# Altium PCB cm4gateway.PcbDoc (part 5 of 5)
Units mil, origin at the board's own origin, x right, y up, seen from the top; angles counter-clockwise.
Board outline 6299.21 x 4960.63 mil, 8 copper layers (Signal 1, Ground Plane 1, Signal 2, Power Plane 1, Power Plane 2, Signal 3, Ground Plane 2, Signal 4), stack 60.024 mil thick; 403 components, 273 nets, 1526 pads, 1156 vias.
Unrouted connection lines stored in the file: 5.
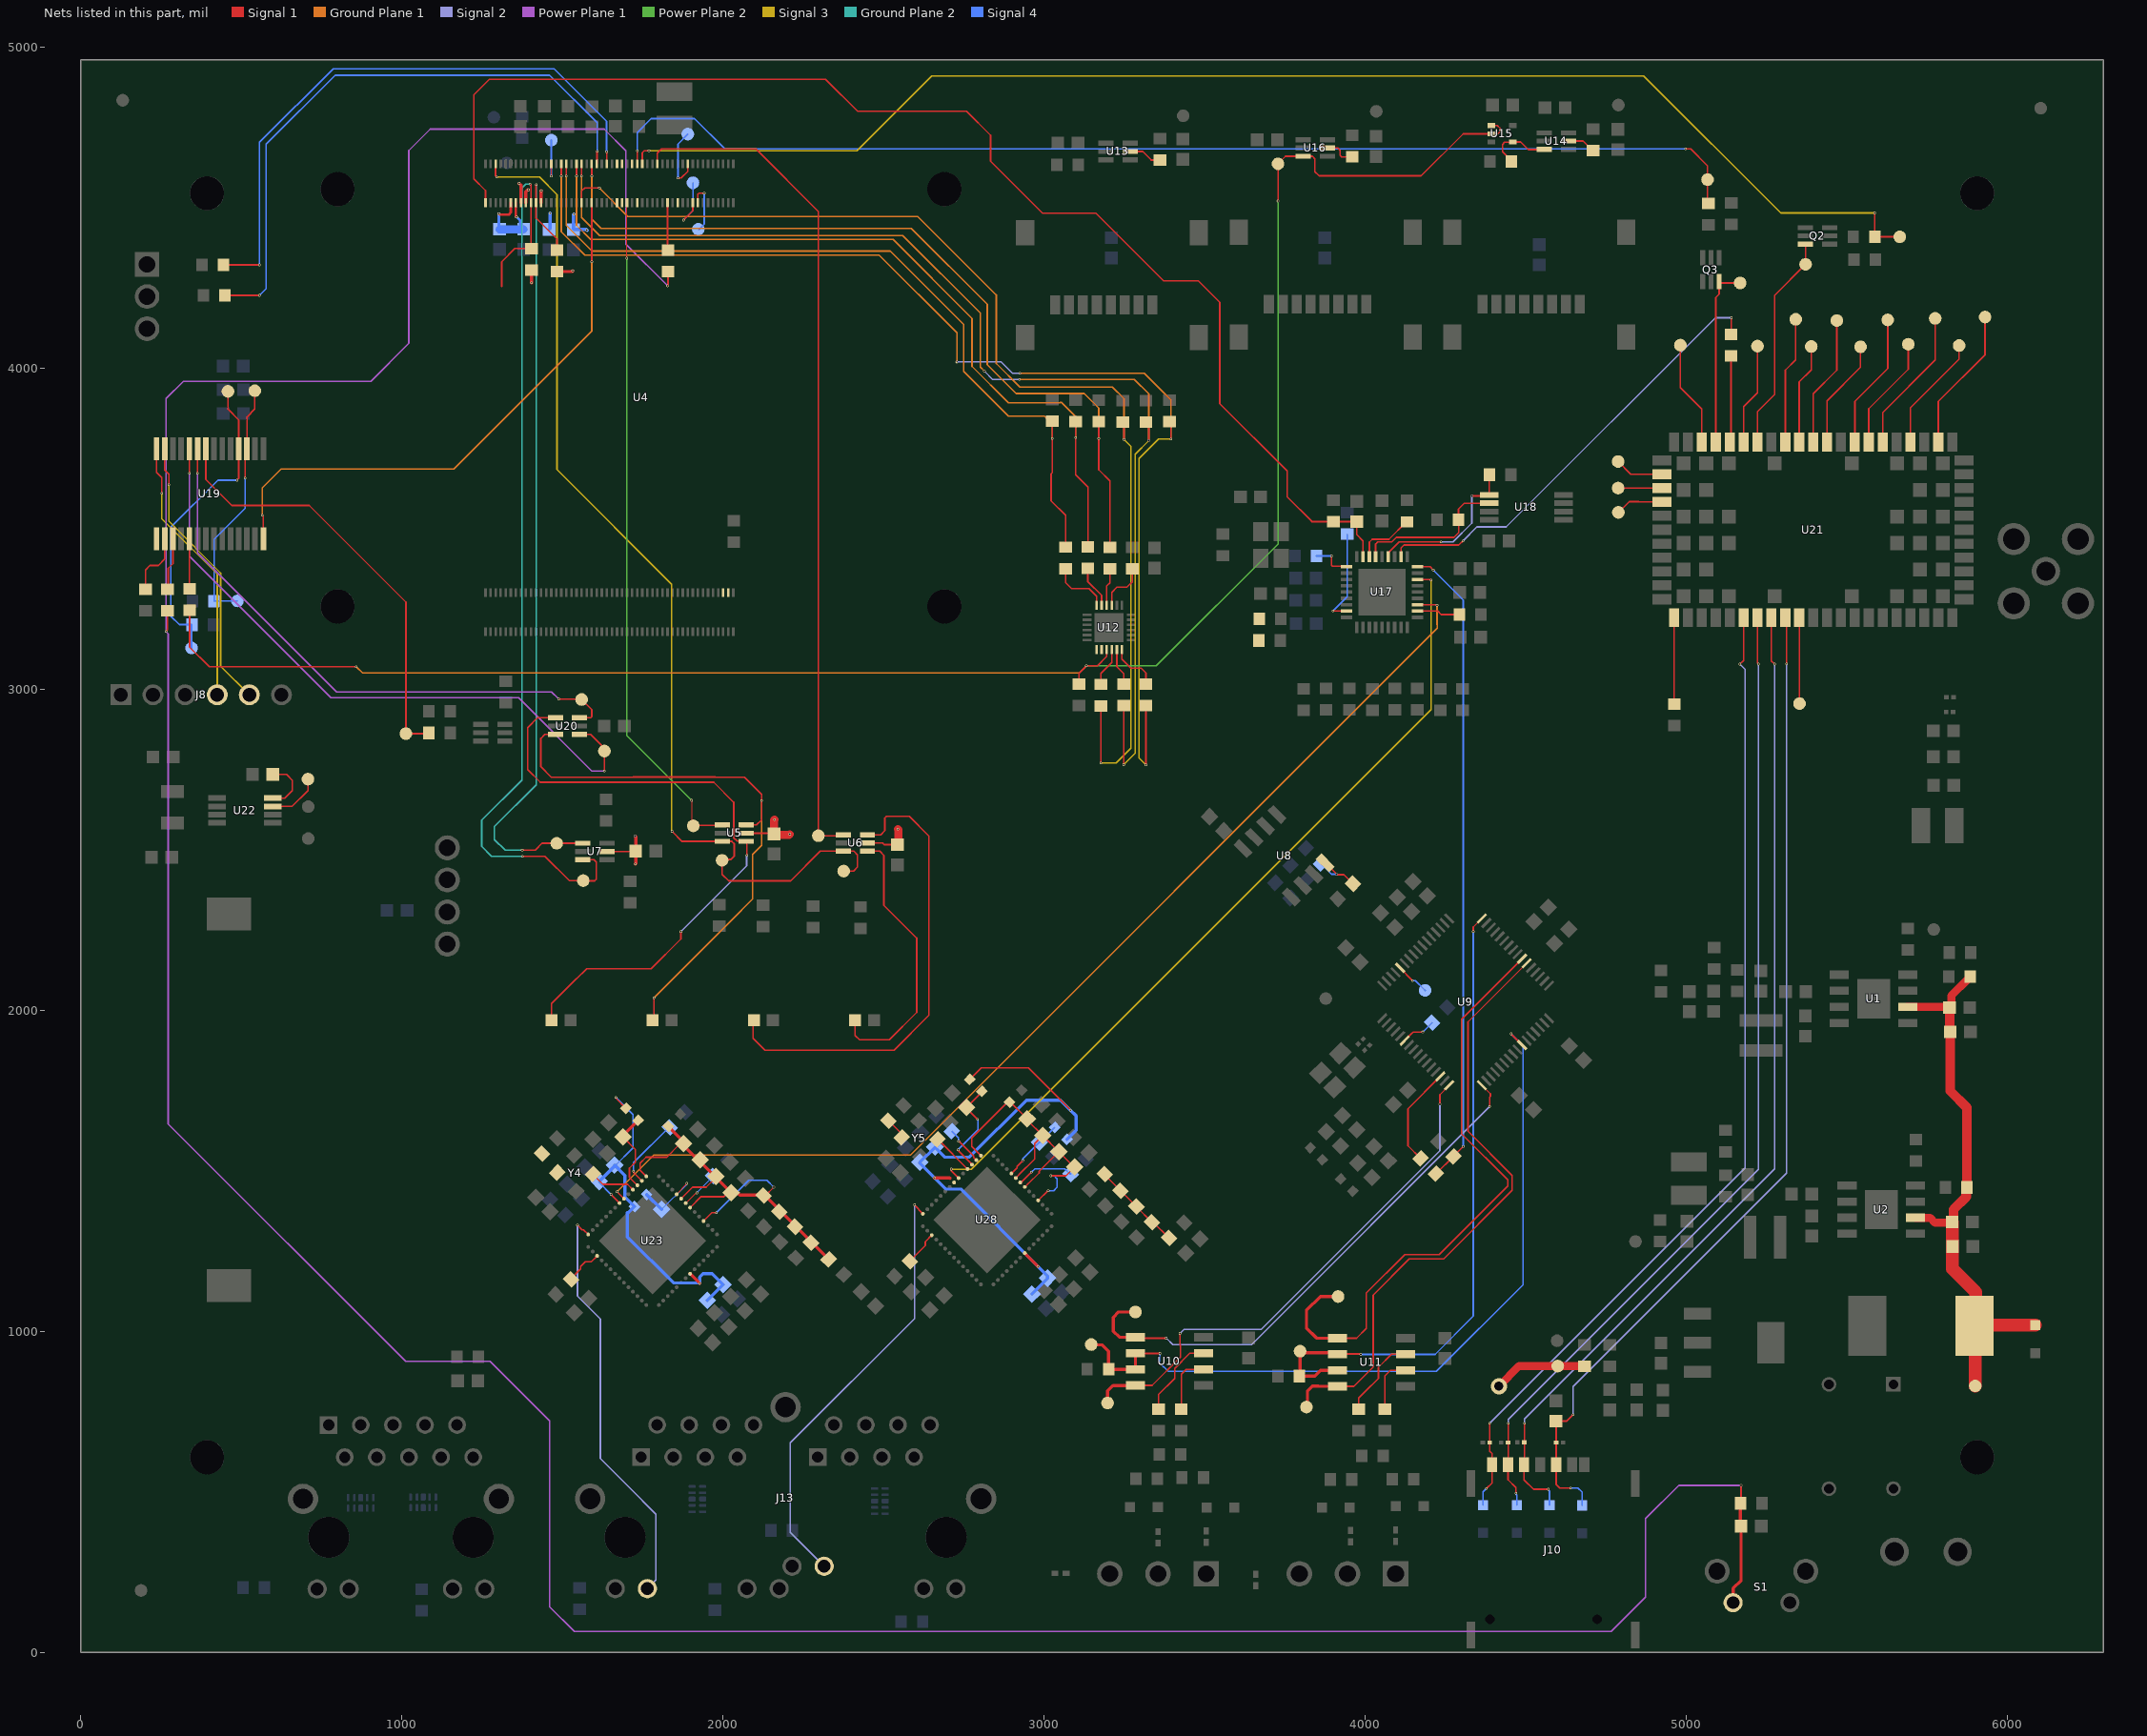
[diagram p10: the nets of this part, all layers, seen from the top]

## Via types
v1: diameter 8/8/8/8/8/8/8/8 (per signal layer), hole 5, Signal 1 to Signal 4, 822 vias
v2: diameter 8, hole 5, Signal 1 to Signal 4, tented both sides, 310 vias
v3: diameter 50, hole 28, Signal 1 to Signal 4, tented both sides, 10 vias
v4: diameter 8/8/8/8/8/8/8/8 (per signal layer), hole 5, Signal 1 to Signal 4, tented both sides, 9 vias
v5: diameter 8, hole 5, Signal 1 to Signal 4, 4 vias
v6: diameter 50, hole 5, Signal 1 to Signal 4, tented both sides, 1 vias

## Nets (pads, with @x,y where several pads share a name; then routed paths per layer and width w, separated by ;. In a path a pad name is that pad's centre, name@x,y a point inside that pad or via, vN(x,y) a via of type N, cw(c..) or ccw(c..) an arc to the next point about the centre after c; other vN are vias at no path point) (continued)
NetR28_2: R28.2 U4.28 | length 147.8
  Signal 1 w5: U4.28@1827.53,4514.4 1827.53,4368.34 R28.2@1828.74,4367.13
NetR34_1: R34.1 R35.2 U8.4 | length 175
  Signal 1 w5: U8.4@3875.61,2458.8 3912.4,2422.01 3933.65,2422.01 R35.2@3961.91,2393.75
  Signal 4 w5: R34.1@3862.5,2456.66 3895.93,2423.23 v2(3910.43,2423.23)
NetR37_1: R37.1 U10.6 | length 185.5
  Signal 1 w5: R37.1@3427.16,756.89 3427.16,866.14 3442.52,881.5 U10.6@3497.05,881.5
NetR39_1: R39.1 U10.7 | length 257.3
  Signal 1 w5: R39.1@3356.3,757.87 3356.3,803.15 3406.5,853.35 3406.5,884.25 3453.74,931.5 U10.7@3497.05,931.5
NetR42_2: R42.2 U9.6 | length 109.2
  Signal 1 w5: U9.6@4122.37,1905.22 4144.32,1927.17 4144.68,1927.17 4149.61,1932.09 v2(4179.13,1932.09)
  Signal 4 w5: v2(4179.13,1932.09) 4207.64,1960.59 R42.2@4207.64,1961.57
NetR43_1: R43.1 R44.2 U17.18 | length 2008.2
  Signal 1 w5: U17.18@4162.4,3380.91 4201.77,3380.91 v2(4211.61,3371.06) ; R43.1@4219.9,1490.73 4220.88,1490.73 R44.2@4275.01,1544.87 4275.01,1545.68 v2(4305.12,1575.79)
  Signal 4 w5: v2(4211.61,3371.06) 4305.12,3277.56 v2(4305.12,1575.79)
NetR43_2: R43.2 U9.14 | length 314
  Signal 1 w5: R43.2@4172.57,1538.06 4132.87,1577.76 4132.87,1693.01 U9.14@4233.73,1793.87
NetR46_1: R46.1 U11.6 | length 176.5
  Signal 1 w5: R46.1@4061.02,756.89 4061.02,861.22 4078.35,878.54 U11.6@4125.98,878.54
NetR48_1: R48.1 U11.7 | length 257.4
  Signal 1 w5: R48.1@3979.33,757.87 3979.33,791.83 4018.21,830.71 4018.7,830.71 4041.34,853.35 4041.34,887.8 4082.09,928.54 U11.7@4125.98,928.54
NetR51_2: R51.2 U12.18 | length 185.7
  Signal 1 w5: R51.2@3066.93,3375 3066.93,3331.69 3085.63,3312.99 3139.76,3312.99 3163.39,3289.37 U12.18@3163.39,3260.93
NetR53_2: R53.2 U12.17 | length 133
  Signal 1 w5: R53.2@3135.83,3375.98 3135.83,3335.63 3179.13,3292.32 U12.17@3179.13,3260.93
NetR54_2: R54.2 U12.16 | length 117.2
  Signal 1 w5: U12.16@3194.88,3260.93 3194.88,3320.87 3204.72,3330.71 R54.2@3204.72,3374.02
NetR55_2: R55.2 U12.4 | length 122
  Signal 1 w5: R55.2@3177.16,3014.76 3177.16,3049.21 3210.63,3082.68 U12.4@3210.63,3122.93
NetR56_2: R56.2 U12.5 | length 116.2
  Signal 1 w5: U12.5@3226.38,3122.93 3226.38,3069.88 3248.03,3048.23 R56.2@3248.03,3015.75
NetR57_2: R57.2 U12.6 | length 156.6
  Signal 1 w5: U12.6@3242.13,3122.93 3242.13,3093.5 3270.67,3064.96 3302.16,3064.96 3316.93,3050.2 R57.2@3316.93,3015.75
NetR58_2: R58.2 U12.15 | length 158
  Signal 1 w5: U12.15@3210.63,3260.93 3210.63,3301.18 3226.38,3316.93 3257.87,3316.93 3274.61,3333.66 R58.2@3274.61,3374.02
NetR59_2: R59.2 U13.5 | length 104.5
  Signal 1 w5: U13.5@3267.72,4674.21 3307.09,4674.21 3333.66,4647.64 R59.2@3361.22,4647.64
NetR67_2: R67.2 U14.5 | length 89
  Signal 1 w5: U14.5@4632.87,4706.69 4678.15,4706.69 4707.68,4677.17 R67.2@4709.65,4677.17
NetR68_2: R68.2 U14.3 U15.4 | length 209.3
  Signal 1 w5: R68.2@4455.71,4642.72 4455.71,4644.69 4427.16,4673.23 4427.16,4695.87 4434.05,4702.75 4458.66,4702.75 U15.4@4459.65,4703.74 4484.25,4703.74 4507.87,4680.12 4557.09,4680.12 U14.3@4558.07,4681.1
NetR69_2: R69.2 U16.5 | length 98.4
  Signal 1 w5: U16.5@3881.89,4685.04 3914.37,4685.04 3921.26,4678.15 3921.26,4662.4 3926.18,4657.48 R69.2@3959.64,4657.48
NetR79_1: R79.1 U17.11 | length 135.4
  Signal 1 w5: U17.11@4162.4,3243.11 4225.39,3243.11 4236.22,3232.28 R79.1@4293.31,3232.28
NetR81_1: R81.1 U17.35 | length 299.8
  Signal 1 w5: v2(3899.61,3243.11) U17.35@3941.93,3243.11
  Signal 4 w5: v2(3899.61,3243.11) 3943.9,3287.4 R81.1@3943.9,3482.28
NetR88_1: R88.1 U17.28 | length 124.1
  Signal 1 w5: v2(3894.68,3414.37) 3894.68,3385.83 3897.64,3382.87 3939.96,3382.87 U17.28@3941.93,3380.91
  Signal 4 w5: R88.1@3848.42,3414.37 v2(3894.68,3414.37)
NetR91_2: R91.2 U19.2 | length 197.9
  Signal 1 w5: R91.2@201.77,3311.02 201.77,3371.06 215.55,3384.84 242.13,3384.84 261.81,3404.53 U19.2@261.81,3468.5
NetR92_2: R92.2 U19.3 | length 164.4
  Signal 1 w5: R92.2@270.67,3311.02 272.64,3312.99 272.64,3375.98 287.4,3390.75 U19.3@287.4,3468.5
NetR93_2: R93.2 U19.5 | length 156.9
  Signal 1 w5: U19.5@338.58,3468.5 338.58,3312.99 R93.2@339.57,3312.01
NetR101_1: R101.1 U21.17 | length 269.3
  Signal 1 w5: U21.17@5134.84,3769.69 5138.78,3773.62 R101.1@5138.78,4037.4
NetR101_2: R101.2 U17.20 | length 1405.5
  Signal 1 w5: U17.20@4111.22,3412.4 4111.22,3439.96 4120.08,3448.82 4291.34,3448.82 v2(4304.13,3461.61) ; R101.2@5138.78,4104.33 5139.76,4105.32 v2(5139.76,4156.5)
  Signal 2 w5: v2(4304.13,3461.61) 4347.44,3504.92 4438.98,3504.92 5090.55,4156.5 v2(5139.76,4156.5)
NetR102_1: R102.1 U21.33 | length 269.1
  Signal 1 w5: U21.33@4961.61,3222.44 4961.61,2954.72 R102.1@4962.6,2953.74
NetR103_2: R103.2 TP58.1 U4.37 | length 4300.2
  Signal 1 w5: U4.37@1748.79,4635.66 1748.79,4670.05 1754.92,4676.18 v5(1769.68,4676.18) ; v5(5586.61,4482.89) R103.2@5586.61,4408.47 TP58.1@5664.37,4408.47
  Signal 3 w5: v5(1769.68,4676.18) 2417.32,4676.18 2650.59,4909.45 4867.13,4909.45 5293.68,4482.89 v5(5586.61,4482.89)
NetR105_2: R105.2 TP60.1 U4.39 | length 3627.4
  Signal 1 w5: U4.39@1733.04,4635.66 1733.16,4635.78 1733.16,4676.07 v5(1733.27,4676.18) ; v5(4997.05,4682.09) 5013.78,4682.09 5065.94,4629.92 TP60.1@5065.94,4586.61 5065.94,4515.75 R105.2@5068.9,4512.8
  Signal 4 w5: v5(1733.27,4676.18) 1733.27,4733.27 1776.57,4776.57 1911.42,4776.57 2005.91,4682.09 v5(4997.05,4682.09)
NetR117_1: R117.1 U23.31 | length 117
  Signal 1 w5: R117.1@1526.98,1162.08 1526.98,1163.79 1557.09,1193.9 1557.09,1201.77 1571.85,1216.54 1590.03,1216.54 U23.31@1608.28,1234.79
NetR118_1: R118.1 Y4.1
NetR119_2: R119.2 U23.16 | length 228.4
  Signal 1 w5: v2@1723.72,1495.77 v2(1721.46,1498.03) 1722.03,1497.46 1722.03,1494.08 U23.16@1747.47,1468.63
  Signal 4 w5: v2(1721.46,1498.03) 1721.46,1524.61 1832.27,1635.42 R119.2@1833.99,1635.42
NetR120_2: R120.2 U23.8 | length 121.4
  Signal 1 w3: U23.8@1883.88,1399.04 1885.06,1399.04 1917.13,1431.1 v2(1918.31,1431.1)
  Signal 4 w3: v2(1918.31,1431.1) 1968.83,1481.63 R120.2@1968.83,1483.84
NetR128_1: R128.1 U28.31 | length 109
  Signal 1 w5: R128.1@2581.73,1218.55 2629.92,1266.73 2629.92,1278.82 U28.31@2650.23,1299.13
NetR129_1: R129.1 Y5.1 | length 69.2
  Signal 1 w5: R129.1@2515.71,1655.47 2556.53,1614.65 Y5.1@2556.53,1603.18
NetR132_2: R132.2 U28.16 | length 121.8
  Signal 1 w4: v2(2734.18,1591.96) 2780.35,1545.79 2780.35,1542.06 U28.16@2789.43,1532.98
  Signal 4 w4: R132.2@2712.64,1622.99 2733.67,1601.96 2733.67,1592.47 v2(2734.18,1591.96)
NetR133_2: R133.2 U28.8 | length 181
  Signal 1 w4: U28.8@2925.84,1463.38 2927.85,1463.38 2959.55,1495.08 v2(2960.63,1495.08)
  Signal 4 w5: v2(2960.63,1495.08) 2971.46,1505.91 3064.12,1505.91 3079.91,1490.12 R133.2@3082.64,1490.12
NetTP1_1: TP1.1 U4.16 | length 169.7
  Signal 1 w5: U4.16@1922.02,4514.4 1922.02,4541.11 1925.2,4544.29 v2(1941.93,4544.29)
  Signal 4 w5: TP1.1@1923.23,4432.09 1926.33,4432.09 1941.93,4447.69 v2(1941.93,4544.29)
NetTP2_1: TP2.1 U4.18 | length 194.3
  Signal 1 w5: v2(1876.97,4460.63) 1906.27,4489.93 U4.18@1906.27,4514.4
  Signal 4 w5: v2(1876.97,4460.63) 1906.5,4490.16 TP2.1@1906.5,4576.77
NetTP3_1: TP3.1 U4.19 | length 210.7
  Signal 1 w5: v2@1861.22,4591.54 1870.08,4591.54 1890.52,4611.98 U4.19@1890.52,4635.66
  Signal 4 w5: v2(1859.98,4591.86) 1859.98,4697.58 TP3.1@1890.75,4728.35
NetTP12_1: TP12.1 U4.73 | length 150.5
  Signal 1 w2: U4.73@1465.33,4635.66 1465.55,4635.44 v2(1465.55,4597.44)
  Signal 4 w5: v2(1465.55,4597.44) TP12.1@1465.55,4709.65
NetTP22_1: TP22.1 U9.60 | length 107.9
  Signal 1 w5: U9.60@4108.45,2132.11 4108.45,2131.41 4147.64,2092.23 v2(4147.64,2091.54)
  Signal 4 w5: v2(4147.64,2091.54) 4156.5,2091.54 TP22.1@4186.39,2061.64
NetTP43_1: TP43.1 U21.13 | length 395.3
  Signal 1 w5: U21.13@5308.07,3769.69 5308.07,3993.11 5340.55,4025.59 TP43.1@5340.55,4151.58
NetTP44_1: TP44.1 U21.12 | length 312.7
  Signal 1 w5: U21.12@5351.38,3769.69 5351.38,3956.69 5388.78,3994.09 TP44.1@5388.78,4066.93
NetTP45_1: TP45.1 U21.11 | length 408.5
  Signal 1 w5: U21.11@5394.68,3769.69 5394.68,3919.29 5468.5,3993.11 TP45.1@5468.5,4147.64
NetTP46_1: TP46.1 U21.10 | length 339.5
  Signal 1 w5: U21.10@5437.99,3769.69 5437.99,3897.64 5542.32,4001.97 TP46.1@5542.32,4065.95
NetTP47_1: TP47.1 U21.4 | length 363
  Signal 1 w5: U21.4@5697.83,3769.69 5697.83,3875.98 5849.41,4027.56 TP47.1@5849.41,4069.88
NetTP48_1: TP48.1 U21.42 | length 268.1
  Signal 1 w5: U21.42@5351.38,3222.44 5352.36,3221.46 TP48.1@5352.36,2954.73
NetTP49_1: TP49.1 U21.2 | length 449.1
  Signal 1 w5: U21.2@5784.45,3769.69 5784.45,3895.67 5930.12,4041.34 TP49.1@5930.12,4158.47
NetTP50_1: TP50.1 U21.25 | length 150.1
  Signal 1 w5: TP50.1@4788.39,3550.2 4821.85,3583.66 4851.38,3583.66 4852.36,3582.68 U21.25@4924.21,3582.68
NetTP51_1: TP51.1 U21.24 | length 136.8
  Signal 1 w5: TP51.1@4787.4,3625.98 U21.24@4924.21,3625.98
NetTP52_1: TP52.1 U21.23 | length 153.1
  Signal 1 w5: TP52.1@4787.4,3708.66 4826.77,3669.29 U21.23@4924.21,3669.29
NetTP53_1: TP53.1 U21.19 | length 328.9
  Signal 1 w5: TP53.1@4981.3,4070.87 4981.3,3938.98 5048.23,3872.05 U21.19@5048.23,3769.69
NetTP54_1: TP54.1 U21.16 | length 316.2
  Signal 1 w5: U21.16@5178.15,3769.69 5178.15,3879.92 5221.46,3923.23 TP54.1@5221.46,4067.91
NetTP55_1: TP55.1 U21.8 | length 422.3
  Signal 1 w5: U21.8@5524.61,3769.69 5524.61,3895.67 5626.97,3998.03 TP55.1@5626.97,4149.61
NetTP56_1: TP56.1 U21.7 | length 355.1
  Signal 1 w5: U21.7@5567.91,3769.69 5567.91,3873.03 5690.94,3996.06 TP56.1@5690.94,4073.82
NetTP57_1: TP57.1 U21.6 | length 452.5
  Signal 1 w5: U21.6@5611.22,3769.69 5611.22,3861.22 5774.61,4024.61 TP57.1@5774.61,4154.53
NetTP62_1: TP62.1 U22.7 | length 165.1
  Signal 1 w5: U22.7@598.42,2634.84 658.47,2634.84 707.68,2684.05 TP62.1@707.68,2719.49
NetU4_58: U4.58 U19.14 | length 1787.2
  Signal 1 w5: v2(565.94,3541.34) 565.94,3540.53 568.9,3537.57 U19.14@568.9,3468.5 ; v2(1591.31,4330.71) U4.58@1591.31,4514.4
  Ground Plane 1 w5: v2(565.94,3541.34) 565.94,3626.97 624.02,3685.04 1162.4,3685.04 1591.31,4113.95 v2(1591.31,4330.71)
NetU17_12: U17.12 U23.20 | length 3445.4
  Signal 1 w5: v2(1670.28,1435.04) 1670.28,1434.47 U23.20@1691.79,1412.96 ; U17.12@4162.4,3262.8 4220.64,3262.8 4222.61,3260.83 v2(4223.43,3260.83)
  Ground Plane 1 w5: v2(1670.28,1435.04) 1784.45,1549.21 2584.05,1549.21 4224.41,3189.57 4224.41,3199.8 4223.43,3200.79 v2(4223.43,3260.83)
NetU17_16: U17.16 U28.20 | length 2570.8
  Signal 1 w4: v2(2710.63,1504.92) 2711.39,1504.16 2711.39,1499.66 U28.20@2733.75,1477.3 ; U17.16@4162.4,3341.54 4201.67,3341.54 4203.64,3339.57 v2(4204.72,3339.57)
  Signal 3 w4: v2(2710.63,1504.92) 2773.62,1504.92 4204.72,2936.02 v2(4204.72,3339.57)
NetU23_18: U23.18 Y4.3 | length 144.2
  Signal 1 w5: Y4.3@1595.41,1488.98 1626.71,1457.68 1702.75,1457.68 U23.18@1719.63,1440.8
NetU28_18: U28.18 Y5.3 | length 132
  Signal 1 w5: Y5.3@2667.88,1597.61 2669.12,1597.61 U28.18@2761.59,1505.14
PGC: J8.5 U19.27 | length 874.8
  Signal 1 w5: U19.27@261.81,3748.03 261.81,3682.09 274.61,3669.29 v2(274.61,3636.81)
  Signal 3 w5: v2(274.61,3636.81) 274.61,3522.64 436.02,3361.22 436.02,3071.46 J8.5@525.2,2982.28
PGD: J8.4 U19.28 | length 844
  Signal 1 w5: U19.28@236.22,3748.03 236.22,3675.2 252.95,3658.47 v2(252.95,3609.25)
  Signal 3 w5: v2(252.95,3609.25) 252.95,3530.51 425.2,3358.27 J8.4@425.2,2982.28
PWR_LED: TP7.1 TP10.1 U4.95 U5.3 U6.3 | length 3280.8
  Signal 1 w5: U4.95@1292.1,4635.66 1292.1,4598.48 1295.27,4595.3 v2(1295.27,4594.49) ; v2(1841.53,2557.09) 1873.03,2525.59 U5.3@1998.03,2525.59 ; U5.3@1997.14,2524.7 U5.3@1998.03,2525.59 ; TP10.1@2375.98,2433.07 2406.5,2433.07 2419.19,2445.76 2419.19,2483.37 2407.48,2495.08 U6.3@2375,2495.08 2303.15,2495.08 2210.63,2402.56 2017.72,2402.56 1997.14,2423.14 TP7.1@1997.14,2466.76 1999.58,2469.21 2024.32,2469.21 2035.43,2480.32 2035.43,2517.72 2027.56,2525.59 U5.3@1998.03,2525.59
  Signal 3 w5: v2(1295.27,4594.49) 1429.13,4594.49 1483.27,4540.36 1483.27,3683.56 1840.55,3326.28 1840.55,2558.07 v2(1841.53,2557.09)
PWR_ON: Q2.6 TP59.1 U21.15 | length 678.1
  Signal 1 w5: U21.15@5221.46,3769.69 5221.46,3864.17 5274.61,3917.32 5274.61,4226.38 TP59.1@5371.06,4322.84 Q2.6@5371.06,4385.83
RESET: Q3.6 TP61.1 U21.18 | length 570.2
  Signal 1 w5: U21.18@5091.53,3769.69 5091.53,4219.49 5102.09,4230.05 Q3.6@5102.09,4268.7 5106.03,4264.76 TP61.1@5167.32,4264.76
RESET_IN: C68.2 R83.2 U4.100 U17.26 | length 4088.1
  Signal 1 w5: U4.100@1260.6,4514.4 1260.6,4552.39 1224.41,4588.58 1224.41,4850.89 1272.64,4899.11 2319.39,4899.11 2419.29,4799.21 2758.86,4799.21 2833.42,4724.66 2833.42,4643.95 2995.08,4482.28 3161.42,4482.28 3372.05,4271.65 3480.32,4271.65 3547.24,4204.72 3547.24,3888.78 3756.89,3679.13 3756.89,3598.43 3833.66,3521.65 R83.2@3900.59,3521.65 C68.2@3973.42,3521.65 3973.42,3481.3 3993.11,3461.61 U17.26@3993.11,3412.4
RPi_1V8_OUT: C24.2 C25.2 U4.88 U4.90 | length 287.8
  Signal 1 w8: v2(1302.16,4480.32) 1305.12,4477.36 1332.68,4477.36 1339.34,4484.03 U4.90@1339.34,4514.4 ; U4.88@1355.09,4514.4 1355.09,4472.67 v2(1357.28,4470.47)
  Signal 4 w8: v2(1302.16,4480.32) 1302.16,4434.28 C24.2@1304.35,4432.09 ; v2(1357.28,4470.47) 1368.67,4459.09 1368.67,4442.58 C25.2@1379.16,4432.09
  Signal 4 w25: C24.2@1304.35,4432.09 C25.2@1379.16,4432.09
RPi_3V3_OUT: C19.2 C20.2 C21.2 C22.2 C23.2 R18.2 R29.1 R30.1 TP69.1 U4.78 U4.84 U4.86 U5.5 U6.5 U7.5 | length 1180.8
  Signal 1 w5: U7.5@1638.78,2494.1 1727.36,2494.1 C21.2@1728.35,2495.08 ; U5.5@2072.83,2551.18 2157.48,2551.18 C19.2@2159.45,2549.21 ; U6.5@2449.8,2520.67 2497.05,2520.67 2502.15,2515.56 C20.2@2543.65,2515.56
  Signal 1 w10: v2(1365.37,4574.59) 1370.84,4569.12 U4.86@1370.84,4514.4 ; U4.84@1386.59,4514.4 1386.59,4549.05 1392.44,4554.91 v2(1394.31,4554.91) ; R29.1@1403.54,4305.12 1403.54,4272.82 1403.76,4272.61 v2@1403.76,4265.54 ; U4.78@1433.83,4514.4 1433.83,4551.52 v2(1434.27,4551.95) ; R30.1@1483.27,4300.2 1529.96,4300.2 v2(1532.37,4302.61) ; v2(1726.59,2542.11) 1728.35,2540.35 C21.2@1728.35,2495.08 1728.35,2456.27 v2(1727.57,2455.5)
  Signal 1 w25: v2(2160.64,2593.29) 2159.45,2592.1 C19.2@2159.45,2549.21 2162.72,2545.95 2205.82,2545.95 v2(2207.89,2548.02) ; v2(2544.5,2563.76) 2546.57,2561.69 2546.57,2518.48 C20.2@2543.65,2515.56 C20.2@2545.65,2513.57 ; v3(4416.34,828.74) 4479.33,891.73 TP69.1@4599.41,891.73 4599.9,891.24 4682.58,891.24 R18.2@4683.07,890.75
  Signal 4 w10: C22.2@1459.14,4431.27 1461.61,4433.74 v2(1461.61,4482.07) ; v2(1535.64,4479.12) 1534.67,4478.14 C23.2@1534.67,4431.1 1574.8,4431.1 v2@1576.98,4428.92
  other v2: 1403.54,4265.75 1575.79,4429.13
RPi_GPIO9: U4.40
RPi_GPIO10: TP6.1 U4.44 U5.1 | length 2117.9
  Signal 1 w2: v2(1700.79,4342.03) 1700.79,4513.64 U4.44@1701.55,4514.4 ; v2(1902.56,2653.54) 1903.71,2652.4 1903.71,2577.91 TP6.1@1907.57,2574.05
  Signal 1 w5: TP6.1@1907.57,2574.05 1909.31,2575.79 1997.05,2575.79 U5.1@1998.03,2576.77
  Power Plane 2 w5: v2(1700.79,4342.03) 1700.79,2855.32 v2(1902.56,2653.54)
RPi_GPIO12: TP9.1 U4.31 U6.1 | length 2643.6
  Signal 1 w5: U4.31@1796.03,4635.66 1796.03,4669.07 1809.06,4682.09 2102.36,4682.09 2297.24,4487.2 TP9.1@2297.24,2543.31 2372.05,2543.31 U6.1@2375,2546.26
RPI_RST: R94.2 TP41.1 U19.22 | length 1357.8
  Signal 1 w5: U19.22@389.76,3748.03 389.76,3652.56 470.47,3571.85 711.61,3571.85 1012.79,3270.67 TP41.1@1012.79,2861.22 1081.69,2861.22 R94.2@1083.66,2863.19
RPi_RXD0: R19.2 U4.51 | length 1870.8
  Signal 1 w5: R19.2@444.88,4320.87 v2(557.09,4320.87) ; v2(1637.79,4673.11) 1638.17,4672.73 1638.17,4636.04 U4.51@1638.55,4635.66
  Signal 4 w5: v2(557.09,4320.87) 557.09,4702.76 786.42,4932.09 1474.41,4932.09 1637.79,4768.7 v2(1637.79,4673.11)
RPi_RXD3: R24.1 TP11.1 TP38.1 U19.17 | length 781.3
  Signal 1 w5: v2(511.81,3657.48) 511.81,3742.13 U19.17@517.72,3748.03 517.72,3847.44 542.32,3872.05 TP38.1@542.32,3929.13
  Signal 4 w5: TP11.1@488.19,3274.61 416.34,3274.61 R24.1@415.35,3273.62 415.35,3466.54 511.81,3562.99 v2(511.81,3657.48)
RPi_TXD0: R20.2 U4.55 | length 1896.5
  Signal 1 w5: R20.2@448.82,4226.38 v2(557.09,4226.38) ; U4.55@1607.06,4635.66 1607.69,4636.3 1607.69,4674.21 v2(1608.27,4674.79)
  Signal 4 w5: v2(557.09,4226.38) 577.76,4247.05 577.76,4696.85 792.32,4911.42 1460.63,4911.42 1608.27,4763.78 v2(1608.27,4674.79)
RPi_TXD3: R23.1 TP8.1 TP37.1 U19.18 | length 986.1
  Signal 1 w5: TP37.1@458.66,3927.17 458.66,3872.05 492.13,3838.58 U19.18@492.13,3748.03 492.13,3656.33 487.2,3651.4 v2(487.2,3650.59)
  Signal 4 w5: TP8.1@345.47,3127.95 345.47,3198.82 R23.1@346.46,3199.8 345.47,3200.79 307.09,3200.79 280.51,3227.36 280.51,3503.94 427.17,3650.59 v2(487.2,3650.59)
RPi_USB_N: U4.103
RPi_USB_P: U4.105
RS485A_EN: R40.2 TP20.1 U9.26 U10.2 U10.3 | length 2457.7
  Signal 1 w5: U10.2@3284.45,931.5 3284.84,931.1 v2(3361.22,931.1) ; v2(4454.72,1926.18) 4454.72,1925.61 4488.45,1891.88 U9.26@4488.45,1891.3
  Signal 1 w10: TP20.1@3146.65,958.66 3147.87,957.44 3181.34,957.44 3200.79,937.99 R40.2@3200.79,881.89 3201.18,881.5 U10.3@3284.45,881.5 U10.2@3284.45,931.5
  Signal 4 w5: v2(3361.22,931.1) 3361.22,900.59 3386.81,875 4221.46,875 4491.14,1144.69 4491.14,1889.76 v2(4454.72,1926.18)
RS485A_RX: TP17.1 U9.17 U10.1 | length 1693.5
  Signal 1 w5: U10.1@3284.45,981.5 3287.6,978.35 v2(3379.92,978.35) ; U9.17@4363.18,1766.03 4389.76,1739.45 4389.76,1731.3 4387.79,1729.33 v2(4387.79,1699.8)
  Signal 1 w10: U10.1@3284.45,981.5 3234.06,981.5 3215.55,1000 3215.55,1043.31 3232.28,1060.04 TP17.1@3284.45,1060.04
  Signal 2 w5: v2(3379.92,978.35) 3380.73,978.35 3400.42,958.66 3646.65,958.66 v2(4387.79,1699.8)
RS485A_TX: TP19.1 U9.16 U10.4 | length 1641.5
  Signal 1 w5: U10.4@3284.45,831.5 3336.42,831.5 3424.42,919.5 3424.42,955.3 3423.23,956.49 v2(3423.23,993.11) ; v2(4232.28,1706.69) 4232.28,1736.74 U9.16@4261.57,1766.03
  Signal 1 w10: TP19.1@3197.83,776.58 3197.83,813.98 3214.57,830.71 U10.4@3283.66,830.71
  Signal 2 w5: v2(3423.23,993.11) 3436.02,1005.91 3676.18,1005.91 4232.28,1562.01 v2(4232.28,1706.69)
RS485B_EN: R49.2 TP24.1 U9.48 U11.2 U11.3 | length 2046.5
  Signal 1 w5: U11.2@3913.39,928.54 3913.98,929.13 3984.42,929.13 3985.41,928.15 v2(3986.22,928.15) ; v2(4336.61,2245.08) 4336.61,2258.66 U9.48@4363.18,2285.22
  Signal 1 w10: U11.3@3913.39,878.54 3860.83,878.54 3842.52,860.24 R49.2@3795.27,860.24 3797.24,862.21 TP24.1@3797.24,937.99 3801.97,933.27 3908.66,933.27 U11.2@3913.39,928.54
  Signal 4 w5: v2(3986.22,928.15) 4217.52,928.15 4336.61,1047.25 v2(4336.61,2245.08)
RS485B_RX: TP21.1 U9.39 U11.1 | length 1917
  Signal 1 w5: U11.1@3913.39,978.54 3972.64,978.54 4002.95,1008.86 4002.95,1119.1 4123.03,1239.17 4230.31,1239.17 4443.76,1452.62 4443.76,1471.32 4300.2,1614.88 4300.2,1971.69 U9.39@4488.45,2159.95
  Signal 1 w10: U11.1@3913.39,978.54 3848.23,978.54 3816.93,1009.84 3816.93,1064.96 3860.24,1108.27 TP21.1@3915.35,1108.27
RS485B_TX: TP23.1 U9.38 U11.4 | length 1919.1
  Signal 1 w5: U11.4@3913.39,828.54 3964.81,828.54 4024.61,888.34 4024.61,1112.91 4136.95,1225.25 4244.23,1225.25 4457.68,1438.7 4457.68,1485.24 4319.88,1623.03 4319.88,1963.54 U9.38@4502.37,2146.03
  Signal 1 w10: TP23.1@3816.93,763.78 3819.88,766.73 3819.88,812.99 3835.63,828.74 3853.35,828.74 3853.54,828.54 U11.4@3913.39,828.54
RST: U19.1
SCL0: R30.2 TP14.1 U4.80 U7.1 | length 2622.4
  Signal 1 w5: v4(1375,2498.03) 1415.35,2498.03 1437.01,2519.69 TP14.1@1482.28,2519.69 U7.1@1563.98,2519.69 ; v2(1418.31,4570.87) 1418.19,4570.75 1418.19,4514.52 U4.80@1418.08,4514.4 1418.08,4466.76 1483.27,4401.57 R30.2@1483.27,4367.13
  Ground Plane 2 w5: v4(1375,2498.03) 1321.85,2498.03 1288.39,2531.5 1288.39,2571.98 1418.31,2701.9 v2(1418.31,4570.87)
SD0_CLK: U4.46
SD0_CMD: U4.47
SD0_DAT0: U4.45
SD0_DAT1: U4.41
SD0_DAT2: U4.24
SD0_DAT3: U4.48
SD_CLK: R54.1 R66.1 U4.57 | length 2605.9
  Signal 1 w5: v2(1591.31,4597.44) U4.57@1591.31,4635.66 ; R66.1@3170.27,3832.68 3170.27,3683.07 3204.72,3648.62 R54.1@3204.72,3440.95
  Ground Plane 1 w5: v2(1591.31,4597.44) 1591.31,4463.81 1620.08,4435.04 2586.61,4435.04 2822.83,4198.82 2822.83,4009.84 2912.4,3920.28 3125,3920.28 3170.28,3875 v2(3170.28,3780.51)
SD_CMD: R55.1 R65.1 U4.62 | length 3571.1
  Signal 1 w5: U4.62@1559.81,4514.4 1559.81,4550.96 1569.88,4561.02 v2(1615.16,4561.02) ; v2(3177.16,2769.69) R55.1@3177.16,2947.84 ; R65.1@3245.08,3831.69 3249.02,3827.76 v2(3249.02,3777.56)
  Ground Plane 1 w5: v2(1615.16,4561.02) 1704.03,4472.15 2606.59,4472.15 2851.38,4227.36 2851.38,4013.78 2924.21,3940.94 3212.6,3940.94 3249.02,3904.53 v2(3249.02,3777.56)
  Signal 3 w5: v2(3177.16,2769.69) 3224.41,2769.69 3270.67,2815.94 3270.67,3755.91 v2(3249.02,3777.56)
SD_DAT0: R53.1 R61.1 U4.63 | length 2552
  Signal 1 w5: v2(1544.07,4597.44) U4.63@1544.07,4635.66 ; R61.1@3098.42,3832.68 3098.42,3667.32 3136.81,3628.94 3136.81,3443.9 R53.1@3135.83,3442.91
  Ground Plane 1 w5: v2(1544.07,4597.44) 1544.07,4444.24 1587.94,4400.37 2529.87,4400.37 2775.59,4154.64 2775.59,4004.92 2888.78,3891.73 3049.21,3891.73 3050.09,3892.61 3054.24,3892.61 3098.43,3848.43 v2(3098.43,3783.46)
SD_DAT1: R51.1 R62.1 U4.67 | length 2504.8
  Signal 1 w5: v2(1512.57,4597.44) U4.67@1512.57,4635.66 ; R62.1@3025.59,3834.65 3025.59,3674.21 3021.76,3670.38 3021.76,3586.35 3066.93,3541.18 R51.1@3066.93,3441.93
  Ground Plane 1 w5: v2(1512.57,4597.44) 1512.57,4444.12 1592.46,4364.24 2521.46,4364.24 2750,4135.69 2750,3989.17 2888.78,3850.39 3000.98,3850.39 3025.59,3825.79 v2(3025.59,3780.51)
SD_DAT2: R57.1 R63.1 U4.69 | length 3829.2
  Signal 1 w5: v2(1496.82,4597.44) U4.69@1496.82,4635.66 ; v2(3316.93,2763.78) R57.1@3316.93,2948.82 ; R63.1@3390.75,3832.68 3394.68,3828.74 v2(3394.68,3778.54)
  Ground Plane 1 w5: v2(1496.82,4597.44) 1496.82,4424.67 1570.11,4351.38 2486.22,4351.38 2728.35,4109.25 v2(2728.35,4018.7) ; v2(2924.21,3983.27) 3312.01,3983.27 3394.68,3900.59 v2(3394.68,3778.54)
  Signal 2 w5: v2(2728.35,4018.7) 2866.14,4018.7 2901.57,3983.27 v2(2924.21,3983.27)
  Signal 3 w5: v2(3316.93,2763.78) 3295.28,2785.43 3295.28,3717.52 3356.3,3778.54 v2(3394.68,3778.54)
SD_DAT3: R56.1 R64.1 U4.61 | length 3691.6
  Signal 1 w5: v2(1559.81,4597.44) U4.61@1559.81,4635.66 ; v2(3248.03,2764.76) R56.1@3248.03,2948.82 ; R64.1@3316.93,3831.69 3325.79,3822.84 v2(3325.79,3773.62)
  Ground Plane 1 w5: v2(1559.81,4597.44) 1559.81,4468.73 1615.77,4412.77 2559.67,4412.77 2801.18,4171.26 2801.18,4002.95 v2(2813.98,3990.16) ; v2(2923.23,3964.57) 3280.51,3964.57 3325.79,3919.29 v2(3325.79,3773.62)
  Signal 2 w5: v2(2813.98,3990.16) 2839.57,3964.57 v2(2923.23,3964.57)
  Signal 3 w5: v2(3248.03,2764.76) 3283.46,2800.2 3283.46,3731.3 v2(3325.79,3773.62)
SDA0: R29.2 TP15.1 U4.82 U7.3 | length 3023.8
  Signal 1 w5: 1311.02,4253.94 1311.02,4330.71 1352.36,4372.05 R29.2@1403.54,4372.05 1402.33,4373.26 U4.82@1402.33,4514.4 1402.33,4550.91 1402.81,4551.38 1402.81,4558.43 1402.33,4558.9 1402.33,4570.11 v2(1399.61,4572.83) ; v4(1375.98,2479.33) 1445.87,2479.33 1521.65,2403.54 TP15.1@1564.96,2403.54 1565.94,2402.56 1600.39,2402.56 1605.32,2407.48 1605.32,2461.61 1598.42,2468.5 U7.3@1563.98,2468.5
  Ground Plane 2 w5: v4(1375.98,2479.33) 1279.53,2479.33 1249.02,2509.84 1249.02,2591.54 1374.02,2716.54 1374.02,4561.02 1385.83,4572.83 v2(1399.61,4572.83)
SEL_SD: R52.2 R93.1 TP30.1 U12.1 U12.2 U12.3 U15.1 U15.2 U16.3 | length 5897.4
  Signal 1 w5: R93.1@339.57,3245.08 339.57,3130.91 400.59,3069.88 v4(858.27,3069.88) ; R52.2@3108.27,3015.75 3108.27,3049.21 v2(3131.89,3072.84) 3166.34,3072.84 3194.88,3101.38 U12.3@3194.88,3122.93 ; v2(3728.35,4519.69) TP30.1@3728.35,4635.83 3751.97,4659.45 U16.3@3807.09,4659.45 3835.63,4659.45 3843.5,4651.58 3843.5,4611.22 3856.3,4598.43 4174.21,4598.43 4305.12,4729.33 U15.2@4392.72,4729.33 4412.4,4729.33 4419.29,4736.22 4419.29,4747.05 4411.42,4754.92 U15.1@4392.72,4754.92
  Power Plane 2 w5: v2(3131.89,3072.84) 3349.41,3072.84 3728.35,3451.77 v2(3728.35,4519.69)
  Ground Plane 1 w5: v4(858.27,3069.88) 877.95,3050.2 3109.25,3050.2 v2(3131.89,3072.84)
SIM_CLK: C88.2 D13.1 J10.C3 U21.38 | length 3118.8
  Signal 1 w5: v2(4376.97,509.84) 4394.67,527.55 J10.C3@4394.67,584.49 4394.67,619.11 4387.79,625.99 C88.2@4387.79,653.54 v2(4387.79,713.58) ; v2(5166.93,3077.76) 5178.15,3088.98 U21.38@5178.15,3222.44
  Signal 2 w5: v2(4387.79,713.58) 5183.07,1508.86 5183.07,3061.61 v2(5166.93,3077.76)
  Signal 4 w5: D13.1@4367.13,458.66 4367.13,500 v2(4376.97,509.84)
SIM_IO: C89.2 D14.1 J10.C7 U21.39 | length 3099.3
  Signal 1 w5: v2(4445.08,713.58) C89.2@4445.08,653.54 4445.08,584.9 J10.C7@4444.67,584.49 4444.67,537.61 4469.49,512.8 v2(4469.49,495.08) ; U21.39@5221.46,3222.44 5221.46,3080.51 v2(5224.21,3077.76)
  Signal 2 w5: v2(4445.08,713.58) 4445.08,725.59 5224.21,1504.72 v2(5224.21,3077.76)
  Signal 4 w5: v2(4469.49,495.08) 4470.06,494.51 4470.06,491.55 4472.44,489.17 D14.1@4472.44,458.66
SIM_RST: C87.2 D12.1 J10.C2 U21.40 | length 3150.8
  Signal 1 w5: v2(4495.47,713.58) C87.2@4495.47,654.53 4495.47,585.29 J10.C2@4494.67,584.49 4494.67,536.83 4523.62,507.87 v2(4569.88,507.87) ; U21.40@5264.76,3222.44 5264.76,3087.6 v2(5274.61,3077.76)
  Signal 2 w5: v2(4495.47,713.58) 4495.47,726.77 5274.61,1505.91 v2(5274.61,3077.76)
  Signal 4 w5: v2(4569.88,507.87) 4569.88,507.06 4573.82,503.13 D12.1@4573.82,458.66
SPD_LED_K_LAN_0: J13.A10 U23.28 | length 1289.6
  Signal 1 w5: v2(1547.24,1330.71) 1561.64,1316.32 1565.72,1316.32 U23.28@1580.44,1301.6
  Signal 2 w5: v2(1547.24,1330.71) 1547.24,1109.25 1618.11,1038.39 1618.11,603.35 1705.71,515.75 1791.34,430.12 1791.34,225.15 J13.A10@1764.72,198.53
SPD_LED_K_LAN_1: J13.B10 U28.28 | length 1367.9
  Signal 1 w4: v2(2596.46,1393.7) 2596.46,1392.79 2622.39,1366.85 U28.28@2622.39,1365.94
  Signal 2 w5: J13.B10@2315.12,268.22 2209.65,373.69 2209.65,652.56 2596.46,1039.37 v2(2596.46,1393.7)
SYS_ERR: TP39.1 U19.23 U20.6 | length 1816.6
  Signal 1 w5: v2(364.17,3672.24) U19.23@364.17,3748.03 ; v2(1488.19,2969.49) 1488.76,2968.91 1558.62,2968.91 TP39.1@1560.03,2967.51 1591.53,2936 1591.53,2914.37 1587.6,2910.43 U20.6@1553.15,2910.43 U20.6@1554.65,2910.43
  Power Plane 1 w5: v2(364.17,3672.24) 364.17,3424.21 797.24,2991.14 1466.53,2991.14 v2(1488.19,2969.49)
SYS_ERR_LED: D8.1 U5.6 U20.3 | length 1820.6
  Signal 1 w5: U20.3@1478.35,2859.25 1445.87,2859.25 1433.07,2846.46 1433.07,2757.87 1465.55,2725.39 1719.49,2725.39 1720.47,2726.38 1976.38,2726.38 1977.36,2725.39 2066.93,2725.39 2120.08,2672.24 v2(2120.08,2652.56) 2120.08,2592.52 2104.33,2576.77 U5.6@2072.83,2576.77 ; D8.1@1781.32,1968.19 1785.43,1972.3 v4(1785.43,2038.39)
  Ground Plane 1 w5: v4(1785.43,2038.39) 2058.07,2311.02 2058.07,2312.01 2092.52,2346.46 2092.52,2485.32 2120.08,2512.88 v2(2120.08,2652.56)
SYS_NET_LED: D9.1 U6.6 | length 1487.9
  Signal 1 w5: D9.1@2096.28,1968.19 2093.5,1965.41 2093.5,1912.4 2130.91,1875 2532.48,1875 2641.73,1984.25 2641.73,2542.32 2580.71,2603.35 2508.86,2603.35 2503.94,2598.43 2503.94,2559.06 2491.14,2546.26 U6.6@2449.8,2546.26
SYS_PWR_LED: D10.1 U6.4 | length 868.2
  Signal 1 w5: D10.1@2411.24,1968.19 2411.24,1921.43 2425.2,1907.48 2517.72,1907.48 2603.35,1993.11 2603.35,2224.41 2500.98,2326.77 2500.98,2482.28 2488.19,2495.08 U6.4@2449.8,2495.08
SYS_WAR: TP40.1 U19.24 U20.4 | length 2070.2
  Signal 1 w5: v2(338.58,3672.24) U19.24@338.58,3748.03 ; U20.4@1553.15,2859.25 1587.62,2859.25 1630.89,2815.98 TP40.1@1630.89,2807.08 v2(1630.9,2745.08)
  Power Plane 1 w5: v2(338.58,3672.24) 338.58,3413.61 779.15,2973.05 1363.79,2973.05 1591.76,2745.08 v2(1630.9,2745.08)
SYS_WAR_LED: D7.1 U5.4 U20.1 | length 1996.8
  Signal 1 w5: D7.1@1466.36,1968.19 1466.36,2020.49 1543.31,2097.44 1544.29,2097.44 1575.79,2128.94 1776.57,2128.94 1869.09,2221.46 v4(1869.09,2245.08) ; U20.1@1478.35,2910.43 1422.24,2910.43 1391.73,2879.92 1391.73,2749.02 1431.1,2709.65 1971.46,2709.65 2033.46,2647.64 2033.46,2537.4 2044.64,2526.22 2072.2,2526.22 2074.8,2523.62 v4(2074.8,2482.28)
  Signal 2 w5: v4(1869.09,2245.08) 2073.82,2449.8 2073.82,2481.3 v4(2074.8,2482.28)
UH_HS_IND: R70.1 U17.25 | length 188.5
  Signal 1 w5: U17.25@4012.79,3412.4 4012.79,3457.68 4021.65,3466.54 4073.82,3466.54 4127.95,3520.67 R70.1@4129.92,3520.67
UH_SCL: R89.2 U17.24 U18.6 | length 498.8
  Signal 1 w5: U17.24@4032.48,3412.4 4032.48,3451.77 4039.37,3458.66 4082.68,3458.66 4096.46,3472.44 4276.57,3472.44 4291.34,3487.21 4291.34,3526.58 R89.2@4290.35,3527.56 ; R89.2@4296.26,3533.47 R89.2@4290.35,3527.56 ; U18.6@4386.3,3578.74 4308.07,3578.74 4290.35,3561.02 R89.2@4290.35,3527.56
UH_SDA: R90.2 U17.22 U18.5 | length 513.9
  Signal 1 w5: U17.22@4071.85,3412.4 4071.85,3424.61 4105.91,3458.66 v2(4236.22,3458.66) ; v2(4331.69,3601.38) 4383.34,3601.38 U18.5@4386.3,3604.33 4386.3,3666.81 R90.2@4386.81,3667.32
  Signal 2 w5: v2(4236.22,3458.66) 4273.62,3458.66 4331.69,3516.73 v2(4331.69,3601.38)
USB_N: R76.2
USB_P: R77.2
USER_PB: C78.2 R28.1 R92.1 R97.1 S1.1 | length 11606.8
  Signal 1 w5: v2(265.75,3179.13) 265.75,3179.95 270.67,3184.87 R92.1@270.67,3244.1 ; v2(1827.76,4255.91) 1828.74,4256.89 R28.1@1828.74,4300.2 ; R97.1@5168.31,464.57 5170.28,466.54 v2(5170.28,519.68)
  Signal 1 w10: S1.1@5145.19,154.8 5145.49,155.1 5145.49,199.62 5170.27,224.41 C78.2@5170.27,392.72 5168.31,394.69 R97.1@5168.31,464.57
  Power Plane 1 w5: v2(1827.76,4255.91) 1697.83,4385.83 1697.83,4676.18 1629.92,4744.09 1088.58,4744.09 1021.65,4677.17 1021.65,4076.92 903.4,3958.66 319.88,3958.66 265.75,3904.53 v2(265.75,3179.13) 272.64,3172.24 272.64,1645.67 1011.81,906.5 1274.61,906.5 1460.63,720.47 1460.63,141.73 1537.4,64.96 4765.75,64.96 4873.03,172.24 4873.03,416.34 4976.38,519.68 v2(5170.28,519.68)
VCC: C92.2 U22.8 | length 171.3
  Signal 1 w5: U22.8@598.42,2660.43 635.83,2660.43 659.45,2684.06 659.45,2715.99 641.18,2734.25 C92.2@598.42,2734.25
VCC_SYS: C5.2 C6.2 C12.2 C13.2 D1.1 F1.2 R4.2 R11.2 TP66.1 U1.2 U2.2 | length 1818.8
  Signal 1 w25: U1.2@5689.56,2010.3 5689.85,2010 5817.41,2010 C6.2@5819.48,2007.93 5824.93,2013.39 5824.93,2044.88 5877.25,2097.2 5879.22,2097.2 5884.44,2102.42 R4.2@5884.44,2104.39 ; U2.2@5713.54,1353.74 5713.84,1353.44 5758.76,1353.44 5774.61,1337.6 5824.8,1337.6 C13.2@5827.76,1340.55 ; C12.2@5828.25,1264.27 C12.2@5828.74,1263.78
  Signal 1 w30: C6.2@5819.48,2007.93 5820.46,2006.95 5820.46,1933.13 C5.2@5821.44,1932.15 5821.44,1748.44 5874.02,1695.87 R11.2@5874.02,1447.84 5871.3,1445.12 5871.3,1418.54 5832.04,1379.28 5832.04,1344.83 C13.2@5827.76,1340.55
  Signal 1 w40: C12.2@5828.25,1264.27 C13.2@5828.25,1340.06 ; C12.2@5828.74,1263.78 5828.74,1193.9 5900.59,1122.05 5900.59,1019.68 F1.2@5897.64,1016.73 ; TP66.1@5899.61,829.73 5899.61,1014.76 F1.2@5897.64,1016.73 ; D1.1@6086.61,1018.7 5899.61,1018.7 F1.2@5897.64,1016.73
VDD33A: R121.2 R122.1 R123.1 R124.1 R125.1 | length 283.9
  Signal 1 w5: R124.1@3189.06,1489.26 3189.06,1487.21 R123.1@3287.44,1388.82 3287.44,1387.76 R122.1@3335.63,1339.57 3339.48,1339.57 R121.2@3388.74,1290.31
VDD33A_1: C97.2 C98.2 C99.2 C100.2 FB5.2 R107.2 R108.1 R109.1 R110.1 R111.1 U23.4 U23.7 U23.9 U23.15 | length 1485
  Signal 1 w5: U23.15@1761.39,1482.55 1742.13,1501.82 1742.13,1523.62 1760.83,1542.32 1824.8,1542.32 1861.59,1579.11 C97.2@1877.33,1579.11 ; U23.9@1869.96,1412.96 1905.83,1448.82 1947.83,1448.82 1976.13,1477.11 C99.2@1976.13,1480.32 ; U23.7@1897.8,1385.12 1931.98,1419.29 2002.85,1419.29 2014.66,1431.1 C100.2@2025.34,1431.1 ; U23.4@1939.56,1343.36 1965.3,1369.09 v2@1979.33,1369.09 ; R110.1@2126.43,1422.94 2132.59,1422.94 v2(2158.46,1448.82)
  Signal 1 w10: FB5.2@1830,1638.33 1877.33,1591 C97.2@1877.33,1584.28 ; C97.2@1877.33,1579.11 1976.13,1480.32 C100.2@2025.34,1431.1 2046.11,1431.1 2052.87,1424.34 2125.04,1424.34 R110.1@2126.43,1422.94 2130.21,1422.94 R107.2@2329.07,1224.08
  Signal 4 w5: v2(1979.43,1369.17) 2080.36,1470.1 2137.18,1470.1 v2(2158.46,1448.82)
VDD33A_2: C117.2 C118.2 C119.2 C120.2 FB8.2 U28.4 U28.7 U28.9 U28.15 | length 1053.5
  Signal 1 w5: U28.15@2803.35,1546.9 2774.46,1575.79 2774.46,1602.21 2885.74,1713.5 FB8.2@2892.63,1713.5 2895.26,1713.5 C117.2@2947.58,1661.17 2947.58,1657.48 C118.2@2995.44,1609.62 ; U28.9@2911.92,1477.3 2921.69,1487.07 2921.69,1487.63 2970.47,1536.42 2970.47,1584.65 C118.2@2995.44,1609.62 ; U28.7@2939.76,1449.46 2949.39,1459.09 2950.23,1459.09 2984.52,1493.38 2984.52,1498.3 C119.2@3045.64,1559.42 ; U28.4@2981.52,1407.7 2982.01,1407.7 3012.3,1437.99 v2(3012.79,1437.99) ; v2(3020.67,1484.25) 3068.9,1484.25 C120.2@3095.84,1511.19 3093.87,1511.19 C119.2@3045.64,1559.42 ; C118.2@2995.44,1609.62 C119.2@3045.64,1559.42
  Signal 4 w5: v2(3012.79,1437.99) 3029.53,1437.99 3040.35,1448.82 3040.35,1474.41 3030.51,1484.25 v2(3020.67,1484.25)
VDDCORE_1: C101.2 C102.2 C103.2 C104.2 FB3.1 FB4.1 U23.21 U23.50 | length 1236.7
  Signal 1 w5: v2(1651.57,1426.18) 1651.57,1425.76 1677.87,1399.46 U23.21@1677.87,1399.04 ; v2(1666.34,1728.35) 1666.34,1726.38 FB4.1@1698.11,1694.6
  Signal 1 w10: U23.50@1897.8,1179.11 1927.32,1149.59 v2(1927.32,1149.46)
  Ground Plane 2 w10: 1897.64,1178.15 1898.63,1178.15
  Signal 4 w5: C102.2@1615.16,1466.54 1615.16,1462.6 v2(1651.57,1426.18) ; C101.2@1662.77,1514.15 1719.49,1570.87 1719.49,1675.2 v2(1666.34,1728.35)
  Signal 4 w10: C102.2@1615.16,1466.54 C101.2@1662.77,1514.15 ; C101.2@1662.77,1517.35 1694.88,1485.24 1694.88,1417.96 FB3.1@1724.6,1388.24 1705.46,1369.1 1701.72,1369.1 1701.72,1294.34 1845.47,1150.59 1926.19,1150.59 v2(1927.32,1149.46) 1927.32,1168.47 1937.99,1179.13 1966.53,1179.13 C104.2@2000.73,1144.94 2000.51,1144.94 C103.2@1951.52,1095.95
VDDCORE_2: C121.2 C122.2 C123.2 C124.2 FB6.1 FB7.1 U28.21 U28.50 | length 1811.9
  Signal 1 w4: FB7.1@2768.53,1784.62 2804.77,1820.87 2950.79,1820.87 3081.69,1689.96 v2(3081.69,1687.99)
  Signal 1 w10: v2(2659.45,1477.36) 2705.85,1477.36 2707.3,1475.91 ; U28.50@2939.76,1243.45 v2(2981.3,1201.91)
  Signal 4 w10: C124.2@2962.42,1115.52 3010.83,1163.93 C122.2@3010.83,1165.35 3010.83,1172.39 v2(2981.3,1201.91) 2740.3,1442.91 2693.9,1442.91 v2(2659.45,1477.36) 2612.82,1523.99 C123.2@2612.82,1525.96 2659.88,1573.02 2690.57,1542.32 2767.72,1542.32 2944.88,1719.49 3051.18,1719.49 3082.18,1688.48 3099.41,1671.26 3099.41,1625.81 FB6.1@3070.95,1597.35
VDDPLL_1: C105.2 FB3.2 U23.10 | length 226.8
  Signal 1 w3: U23.10@1856.04,1426.88 1856.04,1427.88 1887.79,1459.63 v2(1887.79,1460.63)
  Signal 4 w3: C105.2@1809.42,1379.56 1886.84,1456.97 1886.84,1459.67 v2(1887.79,1460.63)
  Signal 4 w10: FB3.2@1762.18,1425.81 1808.44,1379.56 C105.2@1809.42,1379.56
VDDPLL_2: C125.2 FB6.2 U28.10 | length 200.5
  Signal 1 w4: U28.10@2898,1491.22 2916.12,1509.34 2916.12,1513.56 v2(2934.05,1531.5)
  Signal 4 w4: v2(2934.05,1531.5) 2934.05,1536.89 C125.2@2985.6,1588.44 2986.88,1588.44 FB6.2@3033.38,1634.93
VDDUSBPLL_1: C106.2 FB4.2 U23.17 | length 256.1
  Signal 1 w5: C106.2@1688.36,1609.7 C106.2@1688.36,1604.95 1727.36,1565.94 1727.36,1526.58 1708.66,1507.87 1708.66,1479.61 U23.17@1733.55,1454.71
  Signal 1 w10: C106.2@1688.36,1609.7 FB4.2@1735.69,1657.03
VDDUSBPLL_2: C126.2 FB7.2 U28.17 | length 306.1
  Signal 1 w4: v2(2732.28,1564.96) 2732.28,1563.88 2775.51,1520.65 U28.17@2775.51,1519.06 ; C126.2@2758.49,1697.22 2758.49,1694.27 v2(2792.32,1660.43)
  Signal 1 w5: C126.2@2758.49,1697.22 2806.1,1744.83 FB7.2@2806.1,1747.05
  Signal 4 w4: v2(2732.28,1564.96) 2794.29,1626.97 2794.29,1658.47 v2(2792.32,1660.43)
VSIM: C85.1 C86.2 D11.1 J10.C1 U21.41 | length 3151.2
  Signal 1 w5: v2(4639.76,511.81) 4605.69,511.81 4594.29,523.21 C86.2@4594.29,653.54 4594.29,719.69 C85.1@4593.5,720.47 4627.95,720.47 v2(4647.64,740.16) ; U21.41@5308.07,3222.44 5312.01,3218.5 v2(5312.01,3078.74)
  Signal 2 w5: v2(4647.64,740.16) 4647.64,827.76 5312.01,1492.13 v2(5312.01,3078.74)
  Signal 4 w5: v2(4639.76,511.81) 4662.4,511.81 4675.2,499.02 D11.1@4675.2,457.68
pads on no net: FID1.FID FID2.FID FID3.FID J8.6 J10.C6 J10.CD1 J10.MH1 J10.MH2 J10.MP1 J10.MP2 J10.MP3 J10.MP4 J13.A7 J13.B7 J13.MH1 J13.MH2 J14.MH1 J14.MH2 MH1.MH MH2.MH MH3.MH MH4.MH Q1.3 Q1.4 Q1.5 Q2.3 Q2.4 Q2.5 Q3.3 Q3.4 Q3.5 S1.MH1 S1.MH2 U3.4 U4.20 U4.21 U4.25 U4.26 U4.27 U4.30 U4.35 U4.36 U4.38 U4.49 U4.50 U4.56 U4.64 U4.68 U4.70 U4.72 U4.76 U4.89 U4.91 U4.93 U4.94 U4.96 U4.97 U4.99 U4.102 U4.104 U4.106 U4.109 U4.110 U4.111 U4.112 U4.115 U4.116 U4.117 U4.118 U4.121 U4.122 U4.123 U4.124 U4.127 U4.128 U4.129 U4.130 U4.133 U4.134 U4.135 U4.136 U4.139 U4.140 U4.141 U4.142 U4.143 U4.145 U4.146 U4.147 U4.148 U4.149 U4.151 U4.152 U4.153 U4.154 U4.157 U4.158 U4.159 U4.160 U4.163 U4.164 U4.165 U4.166 U4.169 U4.170 U4.171 U4.172 U4.175 U4.176 U4.177 U4.178 U4.181 U4.182 U4.183 U4.184 U4.187 U4.188 U4.189 U4.190 U4.193 U4.194 U4.195 U4.196 U4.199 U4.200 U4.MH U8.6 U8.7 U9.18 U9.19 U9.21 U9.22 U9.23 U9.24 U9.27 U9.28 U9.29 U9.30 U9.32 U9.33 U9.34 U9.36 U9.40 U9.41 U9.43 U9.44 U9.45 U9.46 U9.52 U9.53 U9.54 U9.55 U9.57 U9.58 U9.59 U13.4 U14.4 U16.4 U17.13 U17.17 U17.19 U17.21 U18.1 U18.2 U18.3 U19.4 U19.6 U19.7 U19.9 U19.10 U19.12 U19.13 U19.15 U19.16 U19.21 U19.25 U19.26 U21.9 U21.26 U21.27 U21.31 U21.34 U21.35 U21.36 U21.37 U21.44 U21.45 U21.46 U21.47 U21.48 U21.49 U21.59 U21.62 U21.66 U21.67 U21.68 U21.69 U21.70 U21.71 U21.72 U21.73 U21.74 U21.75 U21.76 U21.77 U21.78 U21.79 U21.80 U21.81 U21.82 U21.83 U21.84 U21.85 U21.86 U21.87 U21.88 U21.89 U21.90 U21.91 U21.92 U21.93 U21.94 U21.95 U21.96 U21.97 U21.98 U21.99 U21.100 U23.1 U23.14 U23.19 U23.22 U23.23 U23.26 U23.29 U23.30 U23.32 U23.37 U23.41 U23.42 U23.43 U23.44 U23.45 U23.46 U23.47 U23.53 U23.54 U23.55 U23.56 U24.6 U24.7 U24.8 U24.9 U24.10 U25.6 U25.7 U25.8 U25.9 U25.10 U26.6 U26.7 U26.8 U26.9 U26.10 U27.6 U27.7 U27.8 U27.9 U27.10 U28.1 U28.14 U28.19 U28.22 U28.23 U28.26 U28.29 U28.30 U28.32 U28.37 U28.41 U28.42 U28.43 U28.44 U28.45 U28.46 U28.47 U28.53 U28.54 U28.55 U28.56

## Polygon pours and split planes (outlines as drawn)
RPi_3V3_OUT on Power Plane 1 "Power Plane 1-RPi_3V3_OUT" (solid, remove dead copper, pour order 48): 2486.22,1063.98 2542.32,1007.87 2542.32,977.36 3209.65,310.04 4544.29,310.04 4544.29,892.72 4354.33,892.72 4354.33,428.15 3331.69,428.15 2651.72,1108.12 2651.72,1194.48 2709.65,1252.41 2709.65,2650.59 1908.46,2650.59 1667.32,2891.73 1667.32,4581.69 1358.27,4581.69 1358.27,2391.73 2486.22,2391.73
5V on Power Plane 1 "Power Plane 1-5V" (solid, remove dead copper, pour order 60): 3449.8,534.45 3483.27,500.98 4208.66,500.98 4244.09,536.42 4244.09,914.37 4272.64,942.91 4967.52,942.91 4967.52,1154.53 4572.44,1154.53 3876.19,1150.39 3597.44,1429.13 3597.44,2307.09 2945.87,2958.66 2945.87,4218.5 2273.62,4890.75 1921.4,4890.75 1921.4,4715.98 2687.99,3944.09 2687.99,2849.27 3449.8,2087.46
1V8 on Power Plane 1 "1V8_L04_P049" (solid, remove dead copper, pour order 49): 4142.86,1956.48 4142.86,2063.2 4271.44,2191.79 4339.78,2191.79 4544.32,1987.24 4294.43,1737.35 4294.43,1801.18 ccw(c4285.43,1801.18) 4291.8,1807.55
1V8 on Power Plane 1 "1V8_L04_P051" (solid, remove dead copper, pour order 51): 4124.86,1952.76 4124.86,2066.93 cw(c4133.85,2066.93) 4127.49,2073.29 4261.35,2207.15 cw(c4267.71,2200.79) 4267.71,2209.79 4343.45,2209.79 cw(c4343.51,2200.81) 4349.87,2207.15 4483.73,2073.29 4630.38,2073.29 4687.01,2129.92 4687.01,2210.63 4304.13,2593.5 3800.56,2089.93 3807.1,1990.14 4163.39,1633.86 4190.94,1633.86 4276.43,1719.35 4276.43,1719.49 4276.43,1797.45 4127.49,1946.39 cw(c4133.86,1952.76)
3V3_SDA on Power Plane 1 "3V3_SDA_L04_P057" (solid, remove dead copper, pour order 57): 4874.02,4862.2 4879.92,4874.02 4580.71,4874.02 4496.06,4789.37 4496.06,4137.8 4613.19,4137.8 4687.01,4211.61 4687.01,4568.9 4799.21,4681.1 4887.8,4681.1 4936.02,4729.33 4936.02,4836.61 4898.62,4874.02 4879.92,4874.02
3V3_SDD on Power Plane 1 "3V3_SDD_L04_P055" (solid, remove dead copper, pour order 55): 3243.9,4830.34 3495.91,4830.34 ccw(c3503.75,4834.77) 3497.38,4828.41 3541.99,4783.8 3541.99,4638.41 3542.04,4637.43 3462.41,4637.43 3350.2,4525.22 3350.2,4167.94 3276.38,4094.12 3159.26,4094.12 3159.26,4745.7
3V3_SDB on Power Plane 1 "3V3_SDB_L04_P056" (solid, remove dead copper, pour order 56): 3885.83,4845.47 4137.83,4845.47 ccw(c4145.67,4849.9) 4139.31,4843.54 4183.91,4798.93 4183.91,4653.54 4183.97,4652.56 4104.33,4652.56 3992.13,4540.35 3992.13,4183.07 3918.31,4109.25 3801.18,4109.25 3801.18,4760.83
NetJ1_2 on Power Plane 1 "NETJ1_2_L04_P059" (solid, remove dead copper, pour order 59): 5608.27,580.71 5693.92,581.67 5888.78,386.81 5937.01,338.58 5937.01,269.69 5898.62,231.3 5805.12,231.3 5761.81,274.61 5761.81,387.8 5712.6,437.01 5639.76,437.01 5577.76,499.02 5577.76,550.2
NetJ1_1 on Power Plane 1 "NETJ1_1_L04_P058" (solid, remove dead copper, pour order 58): 5376.97,580.71 5502.95,580.71 5502.95,496.06 5603.35,395.67 5672.24,395.67 5721.46,346.46 5721.46,269.68 5679.13,227.36 5676.18,230.32 5516.73,230.32 5516.73,348.43 5376.97,488.19
GND on Signal 1 "GND1" (solid, remove dead copper, pour order 54): 10.32,-5.09 cw(c10.32,-0.07) 5.31,-0.07 5.31,4960.56 cw(c10.32,4960.56) 10.32,4965.57 6309.53,4965.57 cw(c6309.53,4960.56) 6314.55,4960.56 6314.55,-0.07 cw(c6309.53,-0.07) 6309.53,-5.09
3v8 on Signal 1 "3V8_L01_P045" (solid, remove dead copper, pour order 45): 4977.36,2103.35 4868.11,2103.35 4868.11,2245.08 5045.28,2422.24 5701.77,2422.24 5802.17,2522.64 5802.17,2890.75 5820.43,2910.02 5821.23,3065.58 5733.27,3153.54 5718.5,3168.31 5718.5,3252.95 5727.36,3261.81 5838.58,3261.81 5894.69,3205.71 5894.69,2911.42 5856.3,2911.42 5894.69,2911.42 5894.69,2302.17 5806.1,2213.58 5627.95,2213.58 5503.94,2337.6 5072.83,2337.6 4977.36,2242.13
5V on Signal 1 "5Vpoly" (solid, remove dead copper, pour order 44): 1952.76,4699.8 1953.74,4698.82 2356.3,4698.82 2356.3,4809.06 2273.62,4891.73 2029.53,4891.73 1934.06,4796.26 1310.04,4796.26 1292.32,4778.54 1292.32,4711.61 1325.79,4678.15 1350.3,4653.63 1350.06,4601.38 1438.77,4601.38 1438.77,4654.32 1484.25,4699.8
NetC2_2 on Signal 1 "NETC2_2_L01_P046" (solid, remove dead copper, pour order 46): 5310.04,1943.9 5310.04,1994.09 5265.75,2038.39 5265.75,2069.88 5240.16,2095.47 4877.95,2095.47 4869.09,2086.61 4869.09,2040.35 4884.84,2024.61 5112.2,2024.61 5131.89,2004.92 5131.89,1950.79 5146.65,1936.02 5148.62,1937.99 5303.15,1937.99
NetC1_2 on Signal 1 "NETC1_2_L01_P047" (solid, remove dead copper, pour order 47): 5437.01,1983.27 5425.2,1971.46 5402.56,1948.82 5341.54,1948.82 5327.76,1935.04 5305.12,1912.4 5136.81,1912.4 5125.98,1901.57 5125.98,1796.26 5145.67,1776.57 5400.59,1776.57 5512.8,1888.78 5512.8,1983.27
NetC8_2 on Signal 1 "NETC8_2_L01_P050" (solid, remove dead copper, pour order 50): 5253.94,1380.91 5334.65,1380.91 5342.52,1373.03 5342.52,1331.69 5349.41,1324.8 5532.48,1324.8 5542.32,1314.96 5542.32,1270.67 5472.44,1200.79 5273.62,1200.79 5249.02,1225.39 5249.02,1375.98
NetC9_2 on Signal 1 "NETC9_2_L01_P052" (solid, remove dead copper, pour order 52): 5230.31,1188.98 5245.08,1188.98 5245.08,1453.74 4863.19,1453.74 4863.19,1326.77 4877.95,1312.01 5085.75,1312.01 5116.14,1272.26 5116.14,1194.88 5122.05,1188.98
3v3 on Power Plane 2 "Power Plane 2-3v3" (solid, remove dead copper, pour order 53): 366.14,63.98 2643.56,63.98 2643.56,780.51 cw(c2652.56,780.51) 2646.2,786.88 2901.12,1041.8 cw(c2907.48,1035.44) 2907.52,1044.43 4427.54,1038.01 5028.54,437.01 5208.66,437.01 5280.51,437.01 5281.5,437.99 5296.26,437.99 5331.69,473.43 5331.69,621.06 4813.98,1138.78 4813.98,2228.35 4365.16,2677.17 4365.16,2891.73 4701.63,3228.2 4701.63,3631.11 4588.79,3743.95 3769.48,3743.95 3355.17,4158.26 3355.17,4386.81 cw(c3364.17,4386.81) 3357.85,4393.21 3425.73,4461.09 cw(c3432.07,4454.78) 3432.09,4463.72 4485.52,4463.72 4682.93,4661.13 4682.93,4815.17 4624.08,4874.02 3072.83,4874.02 3072.83,3564.96 2698.82,3190.94 1400.59,3190.94 981.3,2771.65 378.94,2771.65 281.5,2869.09 281.5,3170.28 480.32,3369.09 480.32,4098.43 482.28,4100.39 454.72,4121.06 405.51,4121.06 380.91,4096.46 380.91,3429.13 159.45,3207.68 159.45,2877.95 164.37,2873.03 164.37,2870.08 432.09,2602.36 935.04,2602.36 935.04,2272.57 1297.7,1909.91 cw(c1291.45,1903.59) 1300.34,1903.58 1300.34,1167.29 cw(c1291.44,1167.28) 1297.7,1160.96 1104.47,967.73 1104.47,965.69 366.14,227.36
GND on Ground Plane 1 "GND2" (solid, remove dead copper, pour order 40): -0.17,-5.33 cw(c-0.17,-0.31) -5.19,-0.31 -5.19,4960.32 cw(c-0.17,4960.32) -0.17,4965.33 6299.04,4965.33 cw(c6299.04,4960.32) 6304.06,4960.32 6304.06,-0.31 cw(c6299.04,-0.31) 6299.04,-5.33
GND on Signal 2 "GND3" (solid, remove dead copper, pour order 41): -0.17,-5.33 cw(c-0.17,-0.31) -5.19,-0.31 -5.19,4960.32 cw(c-0.17,4960.32) -0.17,4965.33 6299.04,4965.33 cw(c6299.04,4960.32) 6304.06,4960.32 6304.06,-0.31 cw(c6299.04,-0.31) 6299.04,-5.33
GND on Signal 3 "GND4" (solid, remove dead copper, pour order 42): -0.17,-5.33 cw(c-0.17,-0.31) -5.19,-0.31 -5.19,4960.32 cw(c-0.17,4960.32) -0.17,4965.33 6299.04,4965.33 cw(c6299.04,4960.32) 6304.06,4960.32 6304.06,-0.31 cw(c6299.04,-0.31) 6299.04,-5.33
GND on Ground Plane 2 "GND5" (solid, remove dead copper, pour order 43): -0.17,-5.33 cw(c-0.17,-0.31) -5.19,-0.31 -5.19,4960.32 cw(c-0.17,4960.32) -0.17,4965.33 6299.04,4965.33 cw(c6299.04,4960.32) 6304.06,4960.32 6304.06,-0.31 cw(c6299.04,-0.31) 6299.04,-5.33
GND on Signal 4 "GND_L08_P061" (solid, remove dead copper, pour order 61): -0.17,-5.33 cw(c-0.17,-0.31) -5.19,-0.31 -5.19,4960.32 cw(c-0.17,4960.32) -0.17,4965.33 6299.04,4965.33 cw(c6299.04,4960.32) 6304.06,4960.32 6304.06,-0.31 cw(c6299.04,-0.31) 6299.04,-5.33

## Keep-outs
Edge.Cuts:
  lines w0.5: 636.92,-0.31 -0.17,-0.31 -0.17,4960.32 6299.04,4960.32 6299.04,-0.31 5987.23,-0.31 ; 1331.24,-0.31 1553.58,-0.31 ; 2174.88,767.41 cw(c2204.55,755.2) 2234.23,767.41 ; 2855.53,-0.31 3097.86,-0.31 ; 4185.26,-0.31 5508.49,-0.31
  lines w10: -0.17,-0.31 -0.17,4960.32 6299.04,4960.32 6299.04,-0.31 -0.17,-0.31

## Silkscreen, mask and mechanical layers (free items; w line width, h text height)
F.SilkS:
  lines w5: 2661.24,2125.67 2661.24,2598.11
Margin:
  circle w0.5: c6219.32,3264.45 r31.5
  circle w0.5: c393.53,4544.57 r61.02
  circle w0.5: c6219.32,3467.2 r31.5
  circle w0.5: c5905.34,4544.57 r61.02